# Altium PCB PCB.PcbDoc (part 2 of 2)
Units mm, origin at the board's own origin, x right, y up, seen from the top; angles counter-clockwise.
Board outline 43.92 x 56.7 mm, 2 copper layers (Top Layer, Bottom Layer), stack 1.571 mm thick; 69 components, 29 nets, 129 pads, 22 vias.
Unrouted connection lines stored in the file: 27.
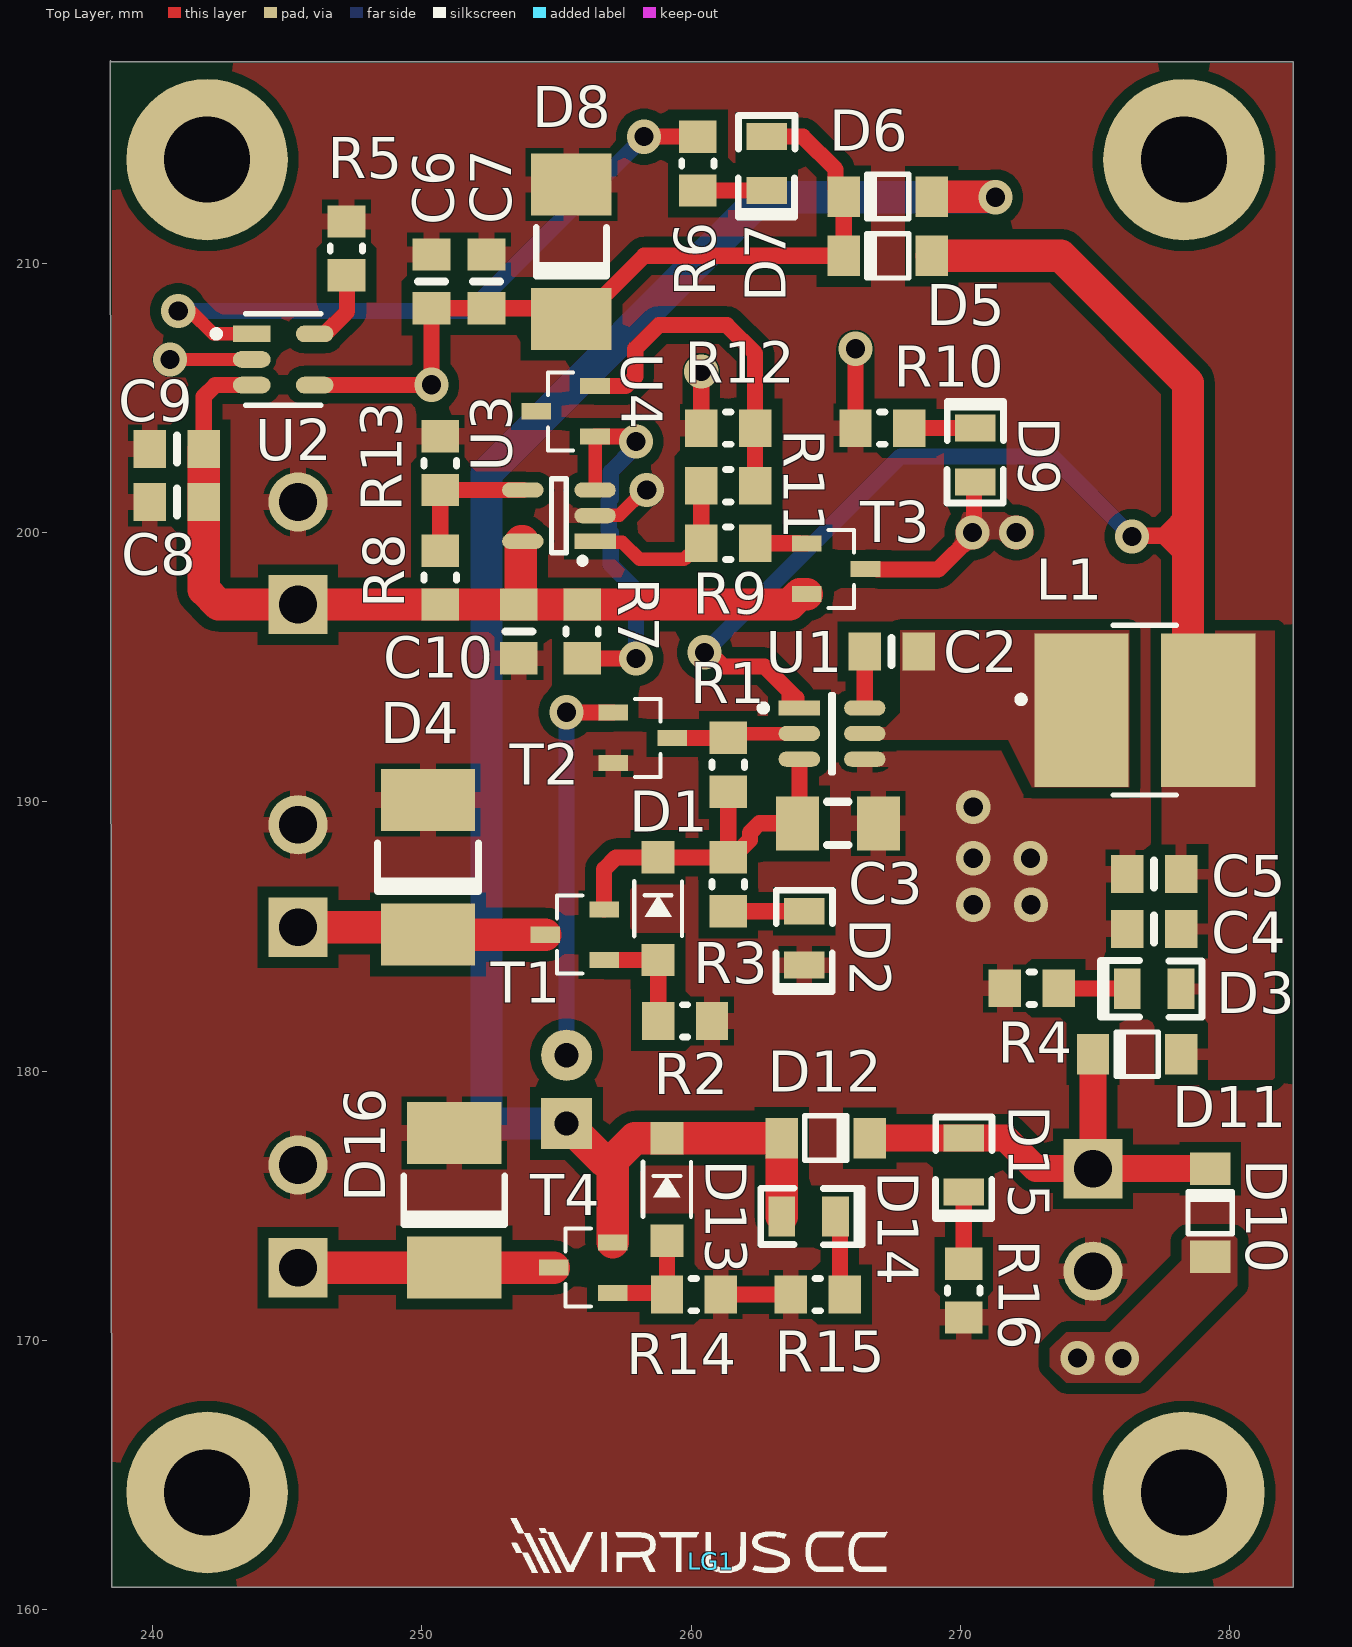
[diagram p0: Top Layer view]

## Part data (continued)
R9: "RES 1M OHM 1% 1/8W 0805", Case Code (Imperial)=0805, Case Code (Metric)=2012, Case/Package=Molded, Manufacturer=Yageo, Max Operating Temperature=155°C, Min Operating Temperature=-55°C, Power Rating=125mW, Resistance Tolerance=1%, Resistor Type="Thick Film", Supplier Part Number=311-1.00MCRCT-ND, Temperature Coefficient=250ppm/°C, Voltage Rating=150V, Category="Chip SMD Resistors", ComponentLink1Description=https://datasheet.ciiva.com/17419/rc0805-17419909.pdf?src-supplier=Future+Electronics, ComponentLink1URL=https://datasheet.ciiva.com/17419/rc0805-17419909.pdf?src-supplier=Future+Electronics, Construction=Rectangular, Depth=1.25mm, Lead Free="Lead Free", Length=2mm, Manufacturer Part Number=RC0805FR-071ML, Military Standard=Not, Packaging="Tape and Reel", Pricing="1=0,1, 10=0,026, 50=0,0162, 100=0,0134, 500=0,00906, 1000=0,00778 (USD)", Reach SVHC Compliant=Unknown, RoHS=Yes, RoHS Compliant=Yes, Stock=145027, Supplier=Digikey, Supplier 1=Digikey, Supplier 2=Mouser, Supplier Part Number 1=311-1.00MCRCT-ND, Supplier Part Number 2=603-RC0805FR-071ML, Tolerance=1%, Voltage Rating (AC)=150V
R11: "RES 270K OHM 1% 1/8W 0805", Case Code (Imperial)=0805, Case Code (Metric)=2012, Manufacturer=Yageo, Max Operating Temperature=155°C, Max Power Dissipation=125mW, Min Operating Temperature=-55°C, Package Quantity=1, Resistance Tolerance=1%, Resistor Type="Thick Film", Supplier Part Number=311-270KCRCT-ND, Temperature Coefficient=100ppm/°C, Voltage Rating=150V, Case/Package=0805, Category="Chip SMD Resistors", ComponentLink1Description=https://datasheet.ciiva.com/11819/0900766b8106beab-11819833.pdf?src-supplier=Rs, ComponentLink1URL=https://datasheet.ciiva.com/11819/0900766b8106beab-11819833.pdf?src-supplier=Rs, ComponentLink2Description=https://datasheet.ciiva.com/2457/pyu-r-int-thick-7-2457227.pdf?src-supplier=Digikey, ComponentLink2URL=https://datasheet.ciiva.com/2457/pyu-r-int-thick-7-2457227.pdf?src-supplier=Digikey, ComponentLink3Description=https://datasheet.ciiva.com/2457/pyu-r-int-thick-7-2457228.pdf?src-supplier=Digikey, ComponentLink3URL=https://datasheet.ciiva.com/2457/pyu-r-int-thick-7-2457228.pdf?src-supplier=Digikey, ComponentLink4Description=https://datasheet.ciiva.com/2457/pyu-r-int-thick-7-2457229.pdf?src-supplier=Digikey, ComponentLink4URL=https://datasheet.ciiva.com/2457/pyu-r-int-thick-7-2457229.pdf?src-supplier=Digikey, ComponentLink5Description=https://datasheet.ciiva.com/5558/rc0805-5558095.pdf?src-supplier=Mouser, ComponentLink5URL=https://datasheet.ciiva.com/5558/rc0805-5558095.pdf?src-supplier=Mouser, Depth=1.25mm, Features="Moisture Resistant", Height=0.024inch, Lead Free="Lead Free", Length=0.079inch, Manufacturer Part Number=RC0805FR-07270KL, Number of Terminations=2, Packaging="Cut Tape", Power Rating=125mW, Pricing="1=0,1, 10=0,025, 50=0,016, 100=0,0133, 500=0,00912, 1000=0,00787 (USD)", Reach SVHC Compliant=Unknown, RoHS=Yes, RoHS Compliant=Yes, Series=RC, Stock=171412, Supplier=Digikey, Supplier 1=Digikey, Supplier 2=Mouser, Supplier Part Number 1=311-270KCRCT-ND, Supplier Part Number 2=603-RC0805FR-07270KL, Technology="THICK FILM", Termination=SMD/SMT, Tolerance=1%, Voltage Rating (AC)=150V, Width=0.049inch, Working Voltage=150V
R12: "RES 16K OHM 1% 1/8W 0805", Case Code (Imperial)=0805, Case Code (Metric)=2012, Manufacturer=Yageo, Max Operating Temperature=155°C, Max Power Dissipation=125mW, Min Operating Temperature=-55°C, Package Quantity=1, Supplier Part Number=311-16.0KCRCT-ND, Temperature Coefficient=100ppm/°C, Tolerance=1%, Voltage Rating=150V, Case/Package=0805, Category="Chip SMD Resistors", ComponentLink1Description=https://datasheet.ciiva.com/2457/pyu-r-int-thick-7-2457554.pdf?src-supplier=Digikey, ComponentLink1URL=https://datasheet.ciiva.com/2457/pyu-r-int-thick-7-2457554.pdf?src-supplier=Digikey, ComponentLink2Description=https://datasheet.ciiva.com/2457/pyu-r-int-thick-7-2457555.pdf?src-supplier=Digikey, ComponentLink2URL=https://datasheet.ciiva.com/2457/pyu-r-int-thick-7-2457555.pdf?src-supplier=Digikey, ComponentLink3Description=https://datasheet.ciiva.com/2457/pyu-r-int-thick-7-2457556.pdf?src-supplier=Digikey, ComponentLink3URL=https://datasheet.ciiva.com/2457/pyu-r-int-thick-7-2457556.pdf?src-supplier=Digikey, ComponentLink4Description=https://datasheet.ciiva.com/16744/rc0805-16744799.pdf?src-supplier=Future+Electronics, ComponentLink4URL=https://datasheet.ciiva.com/16744/rc0805-16744799.pdf?src-supplier=Future+Electronics, ComponentLink5Description=https://datasheet.ciiva.com/15189/getdatasheetpartid-327975-15189909.pdf?src-supplier=Verical, ComponentLink5URL=https://datasheet.ciiva.com/15189/getdatasheetpartid-327975-15189909.pdf?src-supplier=Verical, Construction=Rectangular, Depth=1.25mm, Features="Moisture Resistant", Height=0.024inch, Lead Free="Lead Free", Length=0.079inch, Manufacturer Part Number=RC0805FR-0716KL, Military Standard=Not, Number of Terminations=2, Packaging="Tape and Reel", Power Rating=125mW, Pricing="1=0,1, 10=0,026, 50=0,0162, 100=0,0136, 500=0,00932, 1000=0,00805 (USD)", RoHS=Yes, RoHS Compliant=Yes, Series=RC, Stock=164068, Supplier=Digikey, Supplier 1=Digikey, Supplier 2=Mouser, Supplier Part Number 1=311-16.0KCRCT-ND, Supplier Part Number 2=603-RC0805FR-0716KL, Termination=SMD/SMT, Voltage Rating (DC)=150V, Width=0.049inch
R13: "RES 330K OHM 1% 1/8W 0805", Case Code (Imperial)=0805, Case Code (Metric)=2012, Manufacturer=Yageo, Max Operating Temperature=155°C, Min Operating Temperature=-55°C, Power Rating=125mW, Supplier Part Number=13-RC0805FR-13330KLCT-ND, Temperature Coefficient=100ppm/°C, Tolerance=1%, Voltage Rating=150V, Case/Package=0805, Category="Chip SMD Resistors", ComponentLink1Description=http://www.mouser.com/ds/2/447/Yageo_08112016_RC0805-968729.pdf?src-supplier=Mouser, ComponentLink1URL=http://www.mouser.com/ds/2/447/Yageo_08112016_RC0805-968729.pdf?src-supplier=Mouser, ComponentLink2Description=http://www.yageo.com/documents/recent/PYu-RC_Group_51_RoHS_L_2.pdf?src-supplier=Avnet, ComponentLink2URL=http://www.yageo.com/documents/recent/PYu-RC_Group_51_RoHS_L_2.pdf?src-supplier=Avnet, ComponentLink3Description=https://datasheet.octopart.com/RC0805FR-13330KL-Yageo-datasheet-164759695.pdf?src-supplier=Future+Electronics, ComponentLink3URL=https://datasheet.octopart.com/RC0805FR-13330KL-Yageo-datasheet-164759695.pdf?src-supplier=Future+Electronics, Contact Plating=Tin,Matte, Height=0.5mm, Length=2mm, Manufacturer Part Number=RC0805FR-13330KL, Packaging="Tape and Reel", Pricing="1=0,1, 10=0,025, 50=0,016, 100=0,0133, 500=0,00912, 1000=0,00787, 5000=0,00577, 10000=0,00511 (USD)", RoHS=Yes, RoHS Compliant=Yes, Series=RC, Stock=27015, Supplier=Digikey, Supplier 1=Digikey, Supplier 2=Mouser, Supplier Part Number 1=13-RC0805FR-13330KLCT-ND, Supplier Part Number 2=603-RC0805FR-13330KL, Termination=SMD/SMT, Width=1.25mm
ST1 ST2 ST3 ST4: "HEX STANDOFF M3X0.5 BRASS 13MM"
T1 T4: "MOSFET P-CH 40V 2.4A SOT23", Case/Package=SOT-23, Continuous Drain Current (ID)=2.4A, Drain to Source Breakdown Voltage=-40V, Drain to Source Resistance=64mR, Drain to Source Voltage (Vdss)=40V, Gate to Source Voltage (Vgs)=20V, Input Capacitance=587pF, Manufacturer=Diodes, Max Operating Temperature=150°C, Max Power Dissipation=720mW, Min Operating Temperature=-55°C, Supplier Part Number=DMP4065S-7DICT-ND, Category=MOSFETs, ComponentLink1Description=http://www.farnell.com/datasheets/2649034.pdf?src-supplier=Farnell, ComponentLink1URL=http://www.farnell.com/datasheets/2649034.pdf?src-supplier=Farnell, ComponentLink2Description=http://www.mouser.com/ds/2/115/DMP4065S-537770.pdf?src-supplier=Mouser, ComponentLink2URL=http://www.mouser.com/ds/2/115/DMP4065S-537770.pdf?src-supplier=Mouser, ComponentLink3Description=https://www.diodes.com/assets/Datasheets/DMP4065S.pdf?src-supplier=Digikey, ComponentLink3URL=https://www.diodes.com/assets/Datasheets/DMP4065S.pdf?src-supplier=Digikey, ComponentLink4Description=http://diodes.com/datasheets/DMP4065S.pdf?src-supplier=Avnet, ComponentLink4URL=http://diodes.com/datasheets/DMP4065S.pdf?src-supplier=Avnet, ComponentLink5Description=http://www.farnell.com/datasheets/2649034.pdf?src-supplier=Newark, ComponentLink5URL=http://www.farnell.com/datasheets/2649034.pdf?src-supplier=Newark, ComponentLink6Description=http://www.farnell.com/datasheets/2649034.pdf?src-supplier=Element14, ComponentLink6URL=http://www.farnell.com/datasheets/2649034.pdf?src-supplier=Element14, ComponentLink7Description=https://datasheet.octopart.com/DMP4065S-7-Diodes-Inc.-datasheet-129886328.pdf?src-supplier=TME, ComponentLink7URL=https://datasheet.octopart.com/DMP4065S-7-Diodes-Inc.-datasheet-129886328.pdf?src-supplier=TME, Height=1.1mm, Manufacturer Part Number=DMP4065S-7, Mounting Technology="Surface Mount", Number of Channels=1, Packaging="Cut Tape", Pins=3, Power Dissipation=720mW, Pricing="1=0,43, 10=0,302, 100=0,1523, 500=0,135, 1000=0,10506 (USD)", Rds On Max=80mR, RoHS=Yes, RoHS Compliant=Yes, Series=-, Stock=25010, Supplier=Digikey, Supplier 1=Digikey, Supplier 2=Mouser, Supplier Part Number 1=DMP4065S-7DICT-ND, Supplier Part Number 2=621-DMP4065S-7, Turn-Off Delay Time=36.3ns, Turn-On Delay Time=3.6ns
T2: "TRANS PREBIAS NPN 200MW SOT23-3", Case/Package=SOT-23-3, Collector Emitter Breakdown Voltage=50V, Collector-emitter Voltage-Max=300mV, Continuous Collector Current=100mA, Emitter Base Voltage (VEBO)=30V, JLCPCB Part=C508183, Manufacturer=Diodes, Max Operating Temperature=150°C, Max Power Dissipation=200mW, Min Operating Temperature=-55°C, Package Quantity=3000, Supplier Part Number 1=DDTC143ZCA-FDICT-ND, Transition Frequency=250MHz, Category=BJTs, Collector Emitter Voltage (VCEO)=50V, ComponentLink1Description=http://www.mouser.com/ds/2/115/ds30330-71322.pdf?src-supplier=Mouser, ComponentLink1URL=http://www.mouser.com/ds/2/115/ds30330-71322.pdf?src-supplier=Mouser, ComponentLink2Description=http://www.alliedelec.com/m/d/be0b5f6f3c5081911d08f51c92d34358.pdf?src-supplier=Allied+Electronics, ComponentLink2URL=http://www.alliedelec.com/m/d/be0b5f6f3c5081911d08f51c92d34358.pdf?src-supplier=Allied+Electronics, ComponentLink3Description=http://uk.rs-online.com/webdocs/1321/0900766b81321d3c.pdf?src-supplier=RSComponents, ComponentLink3URL=http://uk.rs-online.com/webdocs/1321/0900766b81321d3c.pdf?src-supplier=RSComponents, ComponentLink4Description=http://components.arrow.com/part/dataview/41508542S9348013N2867?src-supplier=Arrow+Electronics, ComponentLink4URL=http://components.arrow.com/part/dataview/41508542S9348013N2867?src-supplier=Arrow+Electronics, ComponentLink5Description=http://www.diodes.com//datasheets/ds30330.pdf?src-supplier=Avnet, ComponentLink5URL=http://www.diodes.com//datasheets/ds30330.pdf?src-supplier=Avnet, ComponentLink6Description=http://www.diodes.com/_files/datasheets/ds30330.pdf?src-supplier=Future+Electronics, ComponentLink6URL=http://www.diodes.com/_files/datasheets/ds30330.pdf?src-supplier=Future+Electronics, ComponentLink7Description=https://www.diodes.com/assets/Datasheets/ds30330.pdf?src-supplier=Digi-Key, ComponentLink7URL=https://www.diodes.com/assets/Datasheets/ds30330.pdf?src-supplier=Digi-Key, Current Rating=100mA, Element Configuration=Single, Height=1mm, hFE Min=80, Lead Free="Lead Free", Length=3.05mm, Manufacturer Part Number=DDTC143ZCA-7-F, Max Breakdown Voltage=50V, Max Collector Current=100mA, Max Output Current=100mA, Mount="Surface Mount", Number of Pins=3, Operating Supply Voltage=50V, Packaging="Tape and Reel", Polarity=NPN, Pricing 1="1=0,20000, 10=0,18400, 100=0,10000, 500=0,06156, 1000=0,04198 (USD)", Radiation Hardening=No, RoHS=Yes, RoHS Compliant=Yes, Series=-, Stock 1=1278422, Supplier 1=Digi-Key, Supplier 2=Mouser, Supplier 3="Arrow Electronics", Supplier 4=Digi-Key, Supplier 5=Mouser, Supplier 6=Digi-Key, Supplier 7=Mouser, Supplier Part Number 2=621-DDTC143ZCA-F, Supplier Part Number 3=DDTC143ZCA-7-F, Supplier Part Number 4=1727-3045-1-ND, Supplier Part Number 5=771-PDTC143ZT-/T3, Supplier Part Number 6=MUN2233T1GOSCT-ND, Supplier Part Number 7=863-MUN2233T1G, Voltage Rating (DC)=50V, Weight=0.000282oz, Width=1.4mm
T3: "MOSFET P-CHANNEL 20V 4A SOT23", JLCPCB Part=C391636, Manufacturer="Pan Jit", Supplier Part Number 1=3757-PJA3415_R1_00001CT-ND, Manufacturer Part Number=PJA3415_R1_00001, Pricing 1="1=0,40000, 10=0,30100, 100=0,17040, 500=0,11286, 1000=0,08653 (USD)", RoHS=Yes, RoHS Compliant=Yes, Stock 1=8995, Supplier 1=Digikey, Supplier 2=Mouser, Supplier Part Number 2=241-PJA3415_R1_00001
U1: "IC REG BUCK 5V 2A TSOT23-6", Manufacturer=Diodes, Max Operating Temperature=85°C, Max Supply Voltage=32V, Min Operating Temperature=-40°C, Min Supply Voltage=3.8V, Nominal Supply Current=22uA, Output Current=2A, Output Voltage=5V, Supplier Part Number=AP63205WU-7DICT-ND, Supplier Part Number 1=621-AP63205WU-7, Switching Frequency=1.1MHz, Category="Voltage Regulators - Switching", ComponentLink1Description=https://www.diodes.com/assets/Datasheets/AP63200-AP63201-AP63203-AP63205.pdf?src-supplier=Digikey, ComponentLink1URL=https://www.diodes.com/assets/Datasheets/AP63200-AP63201-AP63203-AP63205.pdf?src-supplier=Digikey, Height=1mm, Manufacturer Part Number=AP63205WU-7, Max Duty Cycle=100%, Number of Outputs=1, Pricing="1=1,32, 10=0,831, 25=0,7008, 100=0,5531, 250=0,4808, 500=0,43652, 1000=0,39967 (USD)", RoHS=Yes, Stock=18875, Supplier=Digikey, Supplier 1=Mouser, Supplier 2=Digikey, Supplier Part Number 2=AP63205WU-7DICT-ND
U2: "IC BATT CNTL LI-ION 1CEL SOT23-5", Battery Pack Voltage=4.2V, Case/Package=SOT-23, Drain to Source Resistance=350mR, Manufacturer=Microchip, Max Charge Current=500mA, Max Operating Temperature=85°C, Max Output Voltage=4.5V, Max Power Dissipation=1.54W, Max Supply Voltage=6V, Min Operating Temperature=-40°C, Min Output Voltage=4.168V, Min Supply Voltage=3.75V, Supplier Part Number=MCP73831T-2ACI/OTCT-ND, Supplier Part Number 1=579-MCP73831T-2ACIOT, Voltage Rating=4.534V, Category="Battery Management", ComponentLink1Description=https://datasheet.ciiva.com/22828/0900766b80d2b53a-22828876.pdf?src-supplier=Rs, ComponentLink1URL=https://datasheet.ciiva.com/22828/0900766b80d2b53a-22828876.pdf?src-supplier=Rs, ComponentLink2Description=https://datasheet.ciiva.com/26344/651521-da-01-en-contr-mcp73831t-2aci-ot-sot-23-5-mcp-26344458.pdf?src-supplier=Conrad, ComponentLink2URL=https://datasheet.ciiva.com/26344/651521-da-01-en-contr-mcp73831t-2aci-ot-sot-23-5-mcp-26344458.pdf?src-supplier=Conrad, ComponentLink3Description=https://datasheet.ciiva.com/1931/21984e-1931953.pdf?src-supplier=Digikey, ComponentLink3URL=https://datasheet.ciiva.com/1931/21984e-1931953.pdf?src-supplier=Digikey, ComponentLink4Description=https://datasheet.ciiva.com/1931/21984e-1931954.pdf?src-supplier=Digikey, ComponentLink4URL=https://datasheet.ciiva.com/1931/21984e-1931954.pdf?src-supplier=Digikey, ComponentLink5Description=https://datasheet.ciiva.com/1931/21984e-1931955.pdf?src-supplier=Digikey, ComponentLink5URL=https://datasheet.ciiva.com/1931/21984e-1931955.pdf?src-supplier=Digikey, ComponentLink6Description=https://datasheet.ciiva.com/3213/21984e-3213404.pdf?src-supplier=Avnet, ComponentLink6URL=https://datasheet.ciiva.com/3213/21984e-3213404.pdf?src-supplier=Avnet, ComponentLink7Description=https://datasheet.ciiva.com/28626/630369-28626439.pdf?src-supplier=Element14, ComponentLink7URL=https://datasheet.ciiva.com/28626/630369-28626439.pdf?src-supplier=Element14, ComponentLink8Description=https://datasheet.ciiva.com/46385/630369-46385324.pdf?src-supplier=Element14, ComponentLink8URL=https://datasheet.ciiva.com/46385/630369-46385324.pdf?src-supplier=Element14, ComponentLink9Description=https://datasheet.ciiva.com/1137/630369-1137803.pdf?src-supplier=Element14, ComponentLink9URL=https://datasheet.ciiva.com/1137/630369-1137803.pdf?src-supplier=Element14, ComponentLink10Description=https://datasheet.ciiva.com/1144/630369-1144461.pdf?src-supplier=Newark, ComponentLink10URL=https://datasheet.ciiva.com/1144/630369-1144461.pdf?src-supplier=Newark, ComponentLink11Description=https://datasheet.ciiva.com/16286/filehandler-aspxddocname-en025112-16286957.pdf?src-supplier=Future+Electronics, ComponentLink11URL=https://datasheet.ciiva.com/16286/filehandler-aspxddocname-en025112-16286957.pdf?src-supplier=Future+Electronics, Fault Protection="Over Voltage", Height=1.3mm, Lead Free="Lead Free", Length=3.1mm, Manufacturer Part Number=MCP73831T-2ACI/OT, Mounting Technology="Surface Mount", Number of Cells=1, Number of Channels=1, Number of Outputs=1, Output Current=500mA, Output Voltage=4.2V, Packaging="Tape and Reel", Pins=5, Pricing="1=0,76, 25=0,63, 100=0,6125 (USD)", Radiation Hardening=No, Reach SVHC Compliant=No, RoHS=Yes, RoHS Compliant=Yes, Series=-, Stock=95657, Supplier=Digikey, Supplier 1=Mouser, Supplier 2=Digikey, Supplier Part Number 2=MCP73831T-2ACI/OTDKR-ND, Termination=SMD/SMT, Weight=0.00709oz, Width=1.8mm
U3: "AUTOMOTIVE NANO POWER COMPARATOR", JLCPCB Part=C3658921, Manufacturer="Texas Instruments", Supplier Part Number 1=296-TLV7031QDBVRQ1CT-ND, Manufacturer Part Number=TLV7031QDBVRQ1, Pricing 1="1=0,96000, 10=0,86000, 25=0,81600, 100=0,67040, 250=0,62672, 500=0,55384, 1000=0,48125 (USD)", RoHS=No, RoHS Compliant=Yes, Stock 1=2000, Supplier 1=Digi-Key, Supplier 2=Mouser, Supplier Part Number 2=595-TLV7031QDBVRQ1
U4: "IC VREF SHUNT 1% SOT23-3", Case/Package=TO-236-3, Cathode Current=70uA, Manufacturer=Microchip, Max Operating Temperature=85°C, Min Operating Temperature=-40°C, Min Output Voltage=1.225V, Output Current=12mA, Supplier Part Number 1=576-2572-1-ND, Temperature Coefficient=150ppm/°C, Tolerance=1%, Category="Voltage References", ComponentLink1Description=https://datasheet.ciiva.com/16221/lm4040-16221709.pdf?src-supplier=Future+Electronics, ComponentLink1URL=https://datasheet.ciiva.com/16221/lm4040-16221709.pdf?src-supplier=Future+Electronics, Manufacturer Part Number=LM4041DYM3-1.2-TR, Mount="Surface Mount", Output Type=Fixed, Packaging="Tape and Reel", Pricing 1="1=0,36000, 25=0,30760, 100=0,27560 (USD)", Reference Type=Shunt, RoHS=Yes, Stock 1=2876, Supplier 1=Digi-Key, Supplier 2=Mouser, Supplier Part Number 2=998-LM4041DYM3-1.2TR

## Free pads (board coordinates)
  round 6 hole 3.2: 1(242.025,164.35) 1(242.025,213.85) 1(278.3,164.35) 1(278.3,213.85)

## Via types
v1: diameter 1.27, hole 0.711, Top Layer to Bottom Layer, tented both sides, 22 vias

## Nets (pads, with @x,y where several pads share a name; then routed paths per layer and width w, separated by ;. In a path a pad name is that pad's centre, name@x,y a point inside that pad or via, vN(x,y) a via of type N, cw(c..) or ccw(c..) an arc to the next point about the centre after c; other vN are vias at no path point)
+3.7V: D9.2 D10.2 T3.3 | length 6.5
  Top Layer w0.6: T3.3 266.901,198.65 266.926,198.625 269.175,198.625 270.45,199.9 v1(270.45,200) 270.5,200.05 270.5,201.825 D9.2
  other v1: 276,169.325 274.35,169.35 272.075,200
"+5V Ext": C4.1 C5.1 D3.2 D5.2 D11.2 L1.2 U1.1 | length 52.3
  Top Layer w0.6: v1(260.5,195.55) 260.662,195.55 261.186,195.025 262.725,195.025 263.65,194.1 ; U1.1@263.65,193.575 263.65,194.1 ; U1.1@263.9,193.75 263.9,193.85 263.65,194.1 ; v1(276.375,199.85) 276.403,199.878 277.528,199.878 278.15,200.5 ; 277.55,199.87 278.172,199.249 ; 278.048,200.398 278.447,199.999 ; 278.422,199.878 278.45,199.85 ; 278.425,200.5 278.45,200.525
  Top Layer w1.2: D5.2 273.725,210.275 278.45,205.55 278.45,200.525 278.45,199.85 278.45,199.249 278.45,194.15 L1.2
  Bottom Layer w0.6: v1(260.5,195.55) 267.775,202.825 273.4,202.825 v1(276.375,199.85)
"+5V USB": CONN1.1 D6.2 D12.2 D13.1 D14.2 T4.2 | length 67.3
  Top Layer w0.6: D6.2 D6.2@268.948,212.462 ; v1@271.288,212.462 v1(271.3,212.45)
  Top Layer w1.2: CONN1.1 256.741,176.684 257.084,176.684 ; T4.2 257.084,176.684 ; D14.2 D12.2 D13.1 257.91,177.51 257.084,176.684 ; D6.2@268.948,212.462 v1@271.288,212.462
  Bottom Layer w1.2: CONN1.1 252.751,178.05 252.4,178.401 252.4,202.2 262.65,212.45 v1(271.3,212.45)
GND: C3.2 C4.2 C5.2 C6.2 C7.2 C8.2 C9.2 C10.2 D2.1 D4.2 D8.2 D16.2 J2.2 J3.2 J6.2 J7.2 R2.1 R4.1 R5.1 R10.2 R12.1 R13.1 R14.1 R15.1 R16.1 T2.2 U1.4 U2.2 U3.2 | length 13
  Top Layer w0.5: v1(240.65,206.425) U2.2 ; U3.2 256.444,200.638 257.329,200.638 258.266,201.575 v1(258.35,201.575)
  Top Layer w0.6: R12.1 v1(260.375,205.975) ; R14.1 R15.1 ; R10.2 v1(266.1,206.825)
  other v1: 270.473,186.177 272.623,186.177 270.473,187.902 272.598,187.902 270.473,189.802
NetC2_1: C2.1 U1.6 | length 1.8
  Top Layer w0.6: 266.446,193.802 C2.1
NetC2_2: C2.2 L1.1 U1.5
NetC3_1: C3.1 D1.1 R1.2 R3.2 T1.2 U1.3 | length 14.1
  Top Layer w0.6: T1.2 256.767,187.492 257.21,187.935 D1.1 R3.2 ; R1.2 R3.2 ; 264.025,191.275 264.025,189.275 C3.1 262.536,189.2 262.184,188.849 262.184,188.586 261.833,188.235 261.675,188.235 R3.2
NetC6_1: C6.1 C7.1 D5.1 D6.1 D7.2 D8.1 U2.4 | length 30
  Top Layer w0.6: U2.4 246.02,205.478 250.353,205.478 v1(250.36,205.485) C6.1 C7.1 255.15,208.325 D8.1 255.9,207.925 258.25,210.275 D5.1 D6.1 265.365,212.775 265.365,213.485 264.15,214.7 D7.2
NetCONN1_2: CONN1.2 T2.1 | length 14.7
  Top Layer w0.6: v1(255.375,193.325) 255.385,193.315 T2.1
  Bottom Layer w0.6: CONN1.2 v1(255.375,193.325) v1@255.503,193.197
NetD1_2: D1.2 R2.2 T1.1 | length 4.1
  Top Layer w0.6: T1.1 258.545,184.125 258.775,183.895 R2.2
NetD2_2: D2.2 R3.1 | length 2.8
  Top Layer w0.6: R3.1 D2.2
NetD3_1: D3.1 R4.2 | length 2.6
  Top Layer w0.6: R4.2 273.663,183.063 276.183,183.063 D3.1
NetD7_1: D7.1 R6.2 | length 2.5
  Top Layer w0.6: R6.2 D7.1
NetD9_1: D9.1 R10.1 | length 2.5
  Top Layer w0.6: R10.1 D9.1
NetD13_2: D13.2 R14.2 T4.1 | length 4
  Top Layer w0.6: T4.1 259.04,171.76 R14.2 D13.2
NetD14_1: D14.1 R15.2 | length 3
  Top Layer w0.6: D14.1 265.525,174.44 265.525,171.875 R15.2
NetD15_1: D15.1 R16.2 | length 2.7
  Top Layer w0.6: R16.2 D15.1
NetR1_1: R1.1 T2.3 U1.2 | length 4.8
  Top Layer w0.5: R1.1 261.532,192.532 U1.2
  Top Layer w0.6: T2.3 R1.1
NetR5_2: R5.2 U2.5 | length 2.9
  Top Layer w0.6: U2.5 246.402,207.375 247.225,208.198 247.225,209.525 R5.2
NetR6_1: R6.1 U2.1 | length 25.1
  Top Layer w0.5: v1(240.95,208.225) 241.4,208.225 242.25,207.375 U2.1
  Top Layer w0.6: v1(258.25,214.7) R6.1
  Bottom Layer w0.6: v1(240.95,208.225) 251.775,208.225 v1(258.25,214.7)
NetR7_1: R7.1 U3.3 U4.1 | length 14.3
  Top Layer w0.5: U3.3@256.431,201.775 U4.1
  Top Layer w0.6: R7.1 v1(257.95,195.325) ; U4.1 257.583,203.56 257.769,203.375 v1(257.95,203.375)
  Bottom Layer w0.6: v1(257.95,195.325) 257.95,197.875 257.015,198.81 257.015,199.997 256.94,200.072 256.94,201.178 257.015,201.253 257.015,202.259 257.95,203.194 v1(257.95,203.375)
NetR8_1: R8.1 R13.2 U3.4 | length 5.3
  Top Layer w0.6: R8.1 R13.2 U3.4
NetR9_1: R9.1 R11.2 U3.1 | length 6.2
  Top Layer w0.5: U3.1@256.901,199.675 256.934,199.642 257.445,199.642 258.087,199 259.732,199 259.882,199.15 260.025,199.15 R9.1@260.025,199.25
  Top Layer w0.6: R9.1@260.075,199.2 260.375,199.5 R9.1 R11.2
NetR9_2: R9.2 T3.1 | length 1.9
  Top Layer w0.6: R9.2 264.03,199.6 264.041,199.59 T3.1
NetR11_1: R11.1 R12.2 U4.2 | length 12.8
  Top Layer w0.6: U4.2 257.574,205.44 257.925,205.791 257.925,206.825 258.8,207.7 261.325,207.7 262.375,206.65 R12.2 R11.1
V_Battery: C8.1 C9.1 C10.1 J3.1 R7.2 R8.2 T3.2 U2.3 U3.5 | length 34.4
  Top Layer w0.6: C9.1 241.9,205.05 242.325,205.475 U2.3
  Top Layer w1.2: C9.1 C8.1 241.9,197.875 242.45,197.325 J3.1 R8.2 C10.1 ; U3.5 253.692,199.675 253.675,199.658 253.675,197.4 C10.1 ; T3.2 264.041,197.71 263.655,197.325 R7.2 C10.1
VBUS: D16.1 J6.1 T4.3 | length 9.5
  Top Layer w1.2: J6.1 D16.1 T4.3
VCC: D4.1 J2.1 T1.3 | length 9.3
  Top Layer w1.2: J2.1 249.95,185.34 D4.1 T1.3
VSYS: D10.1 D11.1 D12.1 D15.2 J7.1 | length 17.3
  Top Layer w1: D12.1 D15.2 271.665,177.51 272.8,176.375 J7.1 ; D11.1@274.925,180.55 J7.1 ; D10.1 J7.1
pads on no net: U4.3

## Polygon pours and split planes (outlines as drawn)
GND on Top Layer "GND_L01_P010" (solid, pour order 10): 238.506,217.424 282.321,217.424 282.321,160.825 238.506,160.825
"+5V Ext" on Top Layer "+5V_EXT_L01_P001" (solid, pour order 1): 277.48,179.684 277.48,196.359 281.68,196.359 281.68,179.759 281.605,179.684
+3.7V on Top Layer "+3.7V_L01_P013" (solid, pour order 13): 269.625,199.625 270,199.25 272.55,199.25 272.925,199.625 272.925,200.375 272.55,200.75 270,200.75 269.625,200.375
+3.7V on Top Layer "+3.7V_L01_P002" (solid, pour order 2): 273.325,169.025 273.325,169.7 273.925,170.3 275.55,170.3 278.225,172.975 278.225,173.725 278.4,173.9 280.15,173.9 280.275,173.775 280.275,172.025 276.675,168.425 273.925,168.425
NetC2_2 on Top Layer "NETC2_2_L01_P000" (solid, pour order 0): 265.85,192.312 265.85,192.775 267.225,192.775 267.763,193.312 267.763,196.363 276.263,196.363 276.263,190.538 272.656,190.537 271.769,192.312
GND on Bottom Layer "GND_L02_P012" (solid, pour order 12): 238.506,217.424 282.321,217.424 282.321,160.825 238.506,160.825
+3.7V on Bottom Layer "+3.7V_L02_P009" (solid, pour order 9): 263.037,171.787 266.387,168.437 266.387,168.45 276.7,168.45 277.3,169.05 277.3,169.725 276.7,170.325 267.887,170.325 267.887,170.312 265.737,172.462 265.737,193.887 271.075,199.225 271.075,199.238 272.562,199.238 272.937,199.613 272.937,200.363 272.562,200.738 268.975,200.738 268.975,200.725 263.037,194.787
+3.7V on Bottom Layer "+3.7V_L02_P007" (solid, pour order 7): 269.637,199.613 270.013,199.238 272.562,199.238 272.937,199.613 272.937,200.363 272.562,200.738 270.013,200.738 269.637,200.363
+3.7V on Bottom Layer "+3.7V_L02_P006" (solid, pour order 6): 269.625,199.525 269.625,200.275 270,200.65 272.55,200.65 272.925,200.275 272.925,199.525 272.55,199.15 270,199.15

## Silkscreen, mask and mechanical layers (free items; w line width, h text height)
Bottom Overlay:
  text "Source_IoT" at 267.53,211.458 h1.52
  text "Bateria" at 250.423,202.975 h2.5 r90
  text "-      +" at 248.58,202.8 h2.5 r90
  text "12V~24V" at 252.1,192.125 h2.5 r90
  text "-      +" at 248.505,190.365 h2.5 r90
  text "Vcc" at 249.973,189.5 h2.5 r90
  text "VBUS" at 250.396,177.325 h2.5 r90
  text "-      +" at 248.58,177.075 h2.5 r90
  text "-    +" at 271.495,171.475 h2.5 r270
  text "VSYS" at 269.554,170.875 h2.5 r270
Dimensions:
  circle w0.254: c242.025,164.35 r1.6
  circle w0.254: c242.025,213.85 r1.6
  circle w0.254: c278.3,213.85 r1.6
  circle w0.254: c278.3,164.35 r1.6
  lines w0.2: 238.506,160.825 282.321,160.825 282.321,217.424 238.506,217.424 238.506,160.825
Mechanical 7:
  lines w0.2: 265.725,192.325 265.725,192.7 267.35,192.7 267.775,193.125 267.775,196.375 276.275,196.375 276.275,191.2 276.275,190.55 275.431,190.55 274.294,190.55 272.875,190.55 271.1,192.325 265.725,192.325 ; 269.625,199.625 270,199.25 272.55,199.25 272.925,199.625 272.925,200 272.925,200.375 272.55,200.75 270,200.75 269.625,200.375 269.625,200 269.625,199.625 ; 273.325,169.025 273.325,169.7 273.925,170.3 275.55,170.3 278.225,172.975 278.225,173.725 278.4,173.9 280.15,173.9 280.275,173.775 280.275,172.025 276.675,168.425 273.925,168.425 273.325,169.025 ; 277.625,179.675 277.625,196.35 278.1,196.35 281.675,196.35 281.675,180.1 281.675,179.75 281.6,179.675 277.625,179.675
Mechanical 8:
  lines w0.2: 266.387,168.437 263.037,171.787 263.037,194.787 268.975,200.725 ; 266.387,168.45 273.95,168.45 274.637,168.45 276.013,168.45 276.7,168.45 277.3,169.05 277.3,169.725 276.7,170.325 275.075,170.325 267.887,170.325 ; 267.887,170.312 265.737,172.462 265.737,193.887 271.075,199.225 ; 268.975,200.738 270.013,200.738 272.562,200.738 272.937,200.363 272.937,199.988 272.937,199.613 272.562,199.238 271.075,199.238
Board Shape:
  lines w0.2: 238.506,160.825 238.506,161.641 238.506,165.862 238.506,217.424 282.321,217.424 282.321,165.862 282.321,160.825 246.721,160.825 241.532,160.825 238.506,160.825
Route Tool Path:
  lines w1.2: 237.906,217.424 cw(c238.506,217.424) 238.506,218.024 ; 237.906,217.424 cw(c238.506,217.424) 238.506,218.024 ; 237.906,217.424 237.906,160.3 282.921,160.3 282.921,217.424 ; 238.506,218.024 282.321,218.024 ; 282.321,218.024 cw(c282.321,217.424) 282.921,217.424 ; 282.321,218.024 cw(c282.321,217.424) 282.921,217.424

## Dimensions
242.025,213.85 to 242.025,164.35 on Dimensions
242.025,213.85 to 238.506,217.424 on Dimensions
278.3,164.35 to 242.025,164.35 on Dimensions
282.321,160.825 to 278.3,164.35 on Dimensions
242.025,213.85 to 245.1,210.85 on Dimensions
278.3,213.85 to 275.075,210.9 on Dimensions
278.3,164.35 to 274.475,167.4 on Dimensions
242.025,164.35 to 245.625,167.4 on Dimensions
282.5,217.325 to 282.321,160.825 on Dimensions
282.321,217.424 to 238.506,217.424 on Dimensions